# Altium PCB Baseboard-v2.0.PcbDoc (part 6 of 7)
Units mil, origin at the board's own origin, x right, y up, seen from the top; angles counter-clockwise.
Board outline 4488.19 x 3937 mil, 4 copper layers (Top Layer, Ground, Power + Signal, Bottom Layer), stack 61.81 mil thick; 219 components, 194 nets, 891 pads, 446 vias.
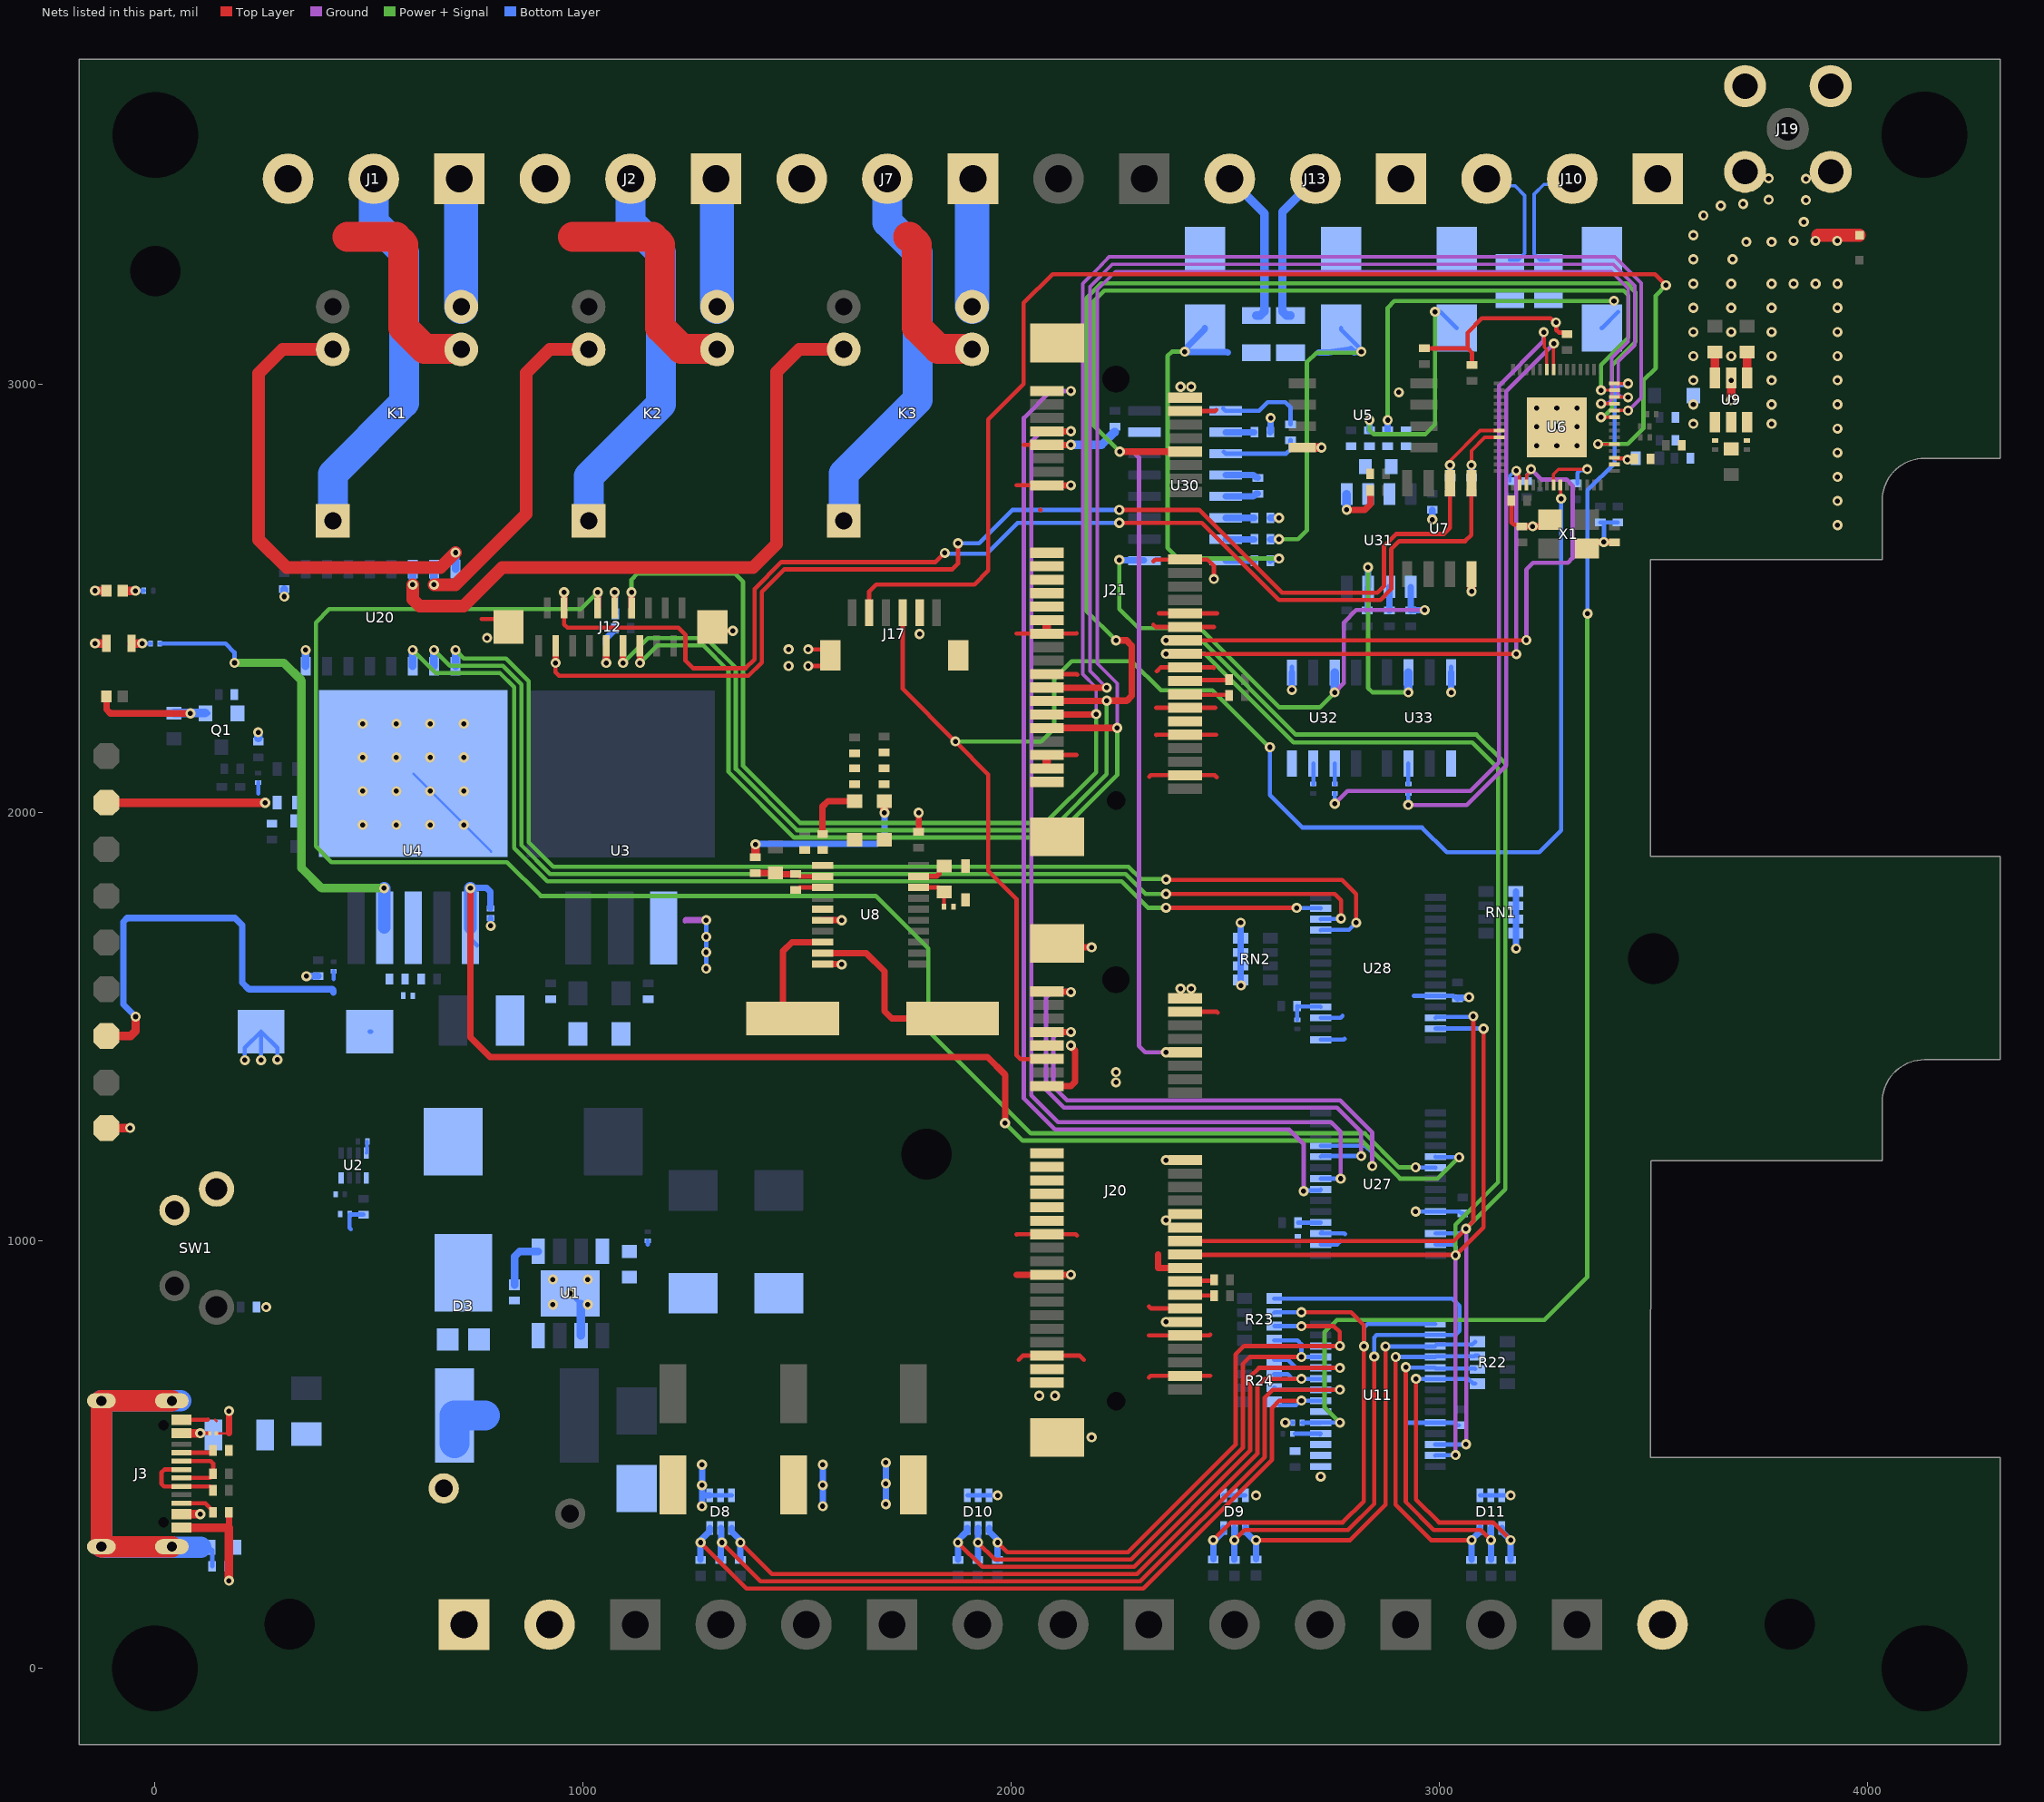
[diagram p5: the nets of this part, all layers, seen from the top]

## Via types
v1: diameter 23.62, hole 11.81, Top Layer to Bottom Layer, 446 vias

## Nets (pads, with @x,y where several pads share a name; then routed paths per layer and width w, separated by ;. In a path a pad name is that pad's centre, name@x,y a point inside that pad or via, vN(x,y) a via of type N, cw(c..) or ccw(c..) an arc to the next point about the centre after c; other vN are vias at no path point) (continued)
GND: ANT1.GND C1.1 C2.1 C4.2 C5.2 C6.2 C7.2 C8.2 C9.1 C10.1 C11.2 C12.2 C13.1 C14.2 C15.2 C16.1 C17.1 C18.1 C19.1 C20.1 C21.1 C22.1 C23.1 C24.1 C25.1 C26.1 C27.1 C28.1 C29.1 C30.1 C32.1 C35.2 C36.2 C37.2 C38.2 C39.1 C40.2 C41.2 C44.2 C45.2 C54.1 D1.2 D2.1 D3.1 D3.3 D4.2 D8.1 D8.2 D8.3 D9.1 D9.2 D9.3 D10.1 D10.2 D10.3 D11.1 D11.2 D11.3 D40.1 D41.1 D42.1 D43.1 J3.A1/B12 J3.B1/A12 J5.1 J10.1 J11.2 J12.MP1 J12.MP2 J13.1 J17.2 J17.MP1 J17.MP2 J19.2 J19.3 J19.4 J19.5 J20.4 J20.9 J20.15 J20.17 J20.18 J20.19 J20.21 J20.23 J20.25 J20.26 J20.27 J20.28 J20.29 J20.34 J20.35 J20.40 J20.42 J20.44 J20.47 J20.49 J20.50 J20.51 J20.53 J20.54 J21.4 J21.9 J21.15 J21.17 J21.18 J21.19 J21.21 J21.23 J21.25 J21.26 J21.27 J21.28 J21.29 J21.34 J21.35 J21.40 J21.42 J21.44 J21.47 J21.49 J21.50 J21.51 J21.53 J21.54 LED1.2 LED2.2 P7.1 R1.2 R2.2 R3.2 R4.2 R8.1 R9.1 R12.1 R13.1 R14.1 R21.1 R48.2 R72.2 RN1.5 RN1.6 RN1.7 RN1.8 RN2.5 RN2.6 RN2.7 RN2.8 SW1.1 SW1.4 U1.6 U1.9 U2.1 U3.1 U4.3 U4.6 U5.4 U6.57 U7.4 U8.5 U8.6 U8.10 U9.2 U11.10 U11.15 U11.16 U11.17 U20.8 U27.10 U27.16 U27.17 U28.10 U28.15 U28.17 U30.15 U31.5 U32.4 U32.5 U33.4 U33.5 X1.2 X1.4 | length 7682.1
  Top Layer w5: 140.23,581.46 143.79,577.89 ; D1.2@143.79,549.34 172.92,549.34
  Top Layer w10: J3.A1/B12@61.92,580.83 123.32,580.83 123.94,581.46 ; 763.21,2451.32 807.8,2451.32 J12.MP1@826.02,2433.09 J12.MP1@823.93,2431 ; J12.MP2@1302.4,2433.09 1311.81,2423.69 v1(1350.19,2423.69) ; v1(1526.4,2341.57) 1559.17,2341.57 1577.79,2360.2 J17.MP2@1577.79,2366.74 1563.96,2380.57 v1(1526.4,2380.57) ; U8.10@1559.8,1645.4 U8.10@1560.16,1645.04 ; 2013,1014 2013.21,1014.21 J20.29@2083.72,1014.21 2150.79,1014.21 2154,1011 ; 2013.12,2417.21 J21.29@2083.72,2417.21 2152.56,2417.21 2153.28,2417.93 ; 2013.12,2763.67 J21.15@2083.72,2763.67 ; 2018,721 2027.75,730.75 J20.47@2083.72,730.75 2160.59,730.75 2170.34,721 ; 2029.35,2858.16 J21.9@2083.72,2858.16 ; 2068.25,2706 2069.06,2706 ; J21.47@2083.72,2133.75 2153.28,2133.75 ; J21.35@2083.72,2322.72 2153.28,2322.72 2155,2321 ; J21.53@2084.77,3118.92 J21.53@2107.35,3096.35 ; J20.53@2107.35,1693.35 J20.53@2116.39,1684.3 ; 2322.01,777.99 J20.44@2406.56,777.99 2463.79,777.99 2465.64,779.85 ; 2322.19,679.57 2326.13,683.5 J20.50@2406.56,683.5 2465.64,683.5 ; 2322.19,845.67 2326.87,840.98 J20.40@2406.56,840.98 ; 2323,2083 2326.5,2086.5 J21.50@2406.56,2086.5 2475.96,2086.5 2480.64,2081.82 ; 2332.54,2438 2337.58,2432.96 J21.28@2406.56,2432.96 2474,2432.96 ; 2332.54,2585.8 2337.18,2590.44 J21.18@2406.56,2590.44 2459.08,2590.44 2474,2575.52 v1(2474,2545) ; 2338.65,2180.54 2339.11,2180.99 J21.44@2406.56,2180.99 2479.09,2180.99 ; 2338.65,2243.98 J21.40@2406.56,2243.98 2477.11,2243.98 ; 2340.54,2329.17 2349.84,2338.47 J21.34@2406.56,2338.47 2473.03,2338.47 2474,2337.5 ; 2345.47,2464.46 J21.26@2406.56,2464.46 2481.5,2464.46 ; J20.4@2406.56,1533.9 2481.1,1533.9 2483,1532 ; 2476.9,2936.9 2480,2940 ; C27.1@2965.57,3083.48 3066.61,3083.48 ; v1@3075.61,2516 v1(3076,2516) ; C26.1@3076.93,3044.63 3076.93,3073.17 3066.61,3083.48 ; C17.1@3168.92,2727.83 3168.92,2677.51 3174.78,2671.65 3189.63,2671.65 C30.1@3193.56,2667.72 ; C54.1@3298.85,3117.15 3295.25,3120.75 3279.73,3120.75 3273.87,3126.61 3273.87,3144.16 v1(3273.13,3144.16) 3270.11,3144.16 3260.46,3153.81 3100.14,3153.81 3066.61,3120.28 3066.61,3083.48
  Top Layer w11: J21.4@2406.56,2936.9 2476.9,2936.9
  Top Layer w14: C32.1@1784.21,1954.13 v1(1784.21,1998.81)
  Top Layer w15: v1(-140,2394.44) v1@-139.91,2394.53 ; LED2.2@-113.79,2394.53 LED2.2@-113.71,2394.61 ; 172.92,329 R2.2@172.92,364.5 ; 172.92,549.34 v1(172.92,601.46) ; U8.6@1559.8,1747.76 v1(1604.4,1747.76) ; U8.10@1560.16,1645.04 v1@1604.4,1645.04 ; 2013.21,919.72 J20.35@2083.72,919.72 v1(2140,919.72) ; J20.15@2083.72,1360.67 2140,1360.67 2149.26,1369.93 2149.26,1443.56 2140,1452.82 v1(2140,1455.16) ; J21.15@2083.72,2763.67 v1(2140,2763.67) ; J21.9@2083.72,2858.16 v1(2140,2858.16) ; J20.53@2116.39,1684.3 v1(2188.34,1684.3) ; 2343.53,935.47 2344.01,935.47 ; 2343.81,967.27 2344.01,967.07 2344.01,935.47 ; J20.34@2396.56,935.47 2344.01,935.47 ; v1(2784.14,2706.59) 2826.98,2706.59 2839.32,2718.94 C24.1@2839.32,2751.56 ; C30.1@3193.56,2667.72 v1(3218.56,2667.72) 3243.45,2667.72 X1.2@3258.95,2683.22 ; X1.4@3345.56,2616.29 3359.99,2630.72 C29.1@3409.79,2630.72 3409.54,2630.97 3385.04,2630.97 v1(3384.79,2631.22)
  Top Layer w20: v1(-140,2517.61) LED1.2@-112.92,2517.61 ; v1@-139.91,2394.53 LED2.2@-113.79,2394.53 ; P7.1@-113.27,1262.51 v1(-58,1262.51) ; J3.B1/A12@61.92,328.87 173.05,328.87 ; 172.92,329 173.05,328.87 ; v1(173.05,205) 173.05,328.87 ; J21.49@2083.72,2102.25 J21.47@2083.72,2133.75 ; J21.29@2083.72,2417.21 J21.27@2083.72,2448.71 ; U5.4@2680.78,2851.84 v1(2725.3,2851.84) ; v1@3075.61,2516 U7.4@3075.61,2556.15 ; v1@3682.11,2962.62 U9.2@3682.11,3014.59
  Top Layer w30: 3885.03,3347.88 3885.03,3347.76 ANT1.GND@3982.17,3347.76
  Ground w10: 1237.94,1745.17 1240.77,1748
  Ground w15: 1240.77,1748 v1(1288,1748)
  Bottom Layer w5: U4.6@603.44,2090.17 U4.6@785.61,1908
  Bottom Layer w10: v1(210,1421) 210,1449.63 C14.2@247.88,1487.5 ; v1(247.88,1421) C14.2@247.88,1487.5 ; v1(286,1422) 286,1449.38 C14.2@247.88,1487.5 ; C36.2@302.21,2521.59 C36.2@302.39,2521.41 ; v1(354,1617) v1@354.04,1617.04 ; R14.1@381.4,1617.07 R14.1@381.4,1617.07 ; R8.1@454.77,1061.09 R8.1@454.77,1060.66 ; 458,1026 454.77,1029.23 R8.1@454.77,1060.66 ; C2.1@487.65,1059.59 486.9,1060.34 455.09,1060.34 R8.1@454.77,1060.66 ; R13.1@783.86,1753.36 R13.1@784.1,1753.12 ; v1@784.1,1734.83 v1(784.33,1734.6) ; v1(970.47,876.09) U1.9@995.47,851.09 ; 1278.14,403.58 1278.85,404.28 ; v1(1288,1634.75) v1(1288,1673) v1(1288,1709) v1(1288,1748) ; D8.1@1296.13,404.28 D8.2@1321.72,404.28 D8.3@1347.31,404.28 ; D10.1@1897.88,404.28 D10.2@1923.47,404.28 D10.3@1949.06,404.28 v1(1968.55,404.28) ; D9.1@2496.37,404.28 D9.2@2521.96,404.28 D9.3@2547.55,404.28 ; v1(2640.9,574.19) R48.2@2658.39,574.19 ; U32.5@2656.27,2326.26 U32.5@2656.27,2340 ; U27.16@2723.68,990.62 2762.15,990.62 2770,998.46 ; U28.15@2723.67,1468.69 2777.28,1468.69 2779.17,1470.57 ; U28.17@2723.67,1519.87 2769.85,1519.87 2774.53,1524.54 ; U27.17@2726.94,1019.48 U27.17@2723.68,1016.21 2778.86,1016.21 2780.35,1014.72 ; 2922.18,571.87 2924.5,574.19 U11.10@2991.08,574.19 3036.79,574.19 3042.9,568.07 C35.2@3046.4,568.07 ; 2941.4,1571.05 U28.10@2991.39,1571.05 3033.49,1571.05 3039.47,1565.07 C38.2@3042.97,1565.07 ; v1(2945.4,1067.39) U27.10@2991.39,1067.39 ; U27.10@2991.54,1067.53 3047.15,1067.53 3051.7,1062.98 C37.2@3055.2,1062.98 ; U33.4@3028.27,2326.59 U33.4@3028.27,2340 ; D11.1@3095.55,404.28 D11.2@3121.14,404.28 D11.3@3146.73,404.28 v1(3167.14,404.28) ; C19.1@3376.96,2676.85 3377.22,2677.12 C19.1@3385.23,2677.12 ; v1@3385.23,2628.69 C19.1@3385.23,2677.12 ; C18.1@3417.28,2677.12 C19.1@3385.23,2677.12
  Bottom Layer w14: v1@784.1,1734.83 R13.1@784.1,1753.12
  Bottom Layer w15: C36.2@302.21,2521.24 C36.2@302.39,2521.41 ; v1(1278.14,378.98) 1278.14,403.58 v1(1278.14,427.98) v1(1278.14,475.98) ; 1278.85,404.28 D8.1@1296.13,404.28 ; v1(1560.14,378.98) v1(1560.14,427.98) v1(1560.14,475.98) ; v1(1707.5,383.89) v1(1707.5,431.89) v1(1707.5,480.89) ; RN2.5@2536.4,1608.01 RN2.6@2536.4,1641.08 RN2.7@2536.4,1672.57 RN2.8@2536.4,1705.65 v1(2536.4,1741.91) ; C45.2@2605.4,2887.72 2605.95,2888.26 2605.95,2920.67 v1(2606.49,2921.21) ; C44.2@2605.5,2687.82 C44.2@2605.4,2687.72 v1(2626,2687.72) ; v1(2656.27,2285.81) U32.5@2656.27,2326.26 ; v1(2984.21,2683.81) C40.2@2984.21,2706.59 ; v1(3028.27,2280) U33.4@3028.27,2326.59 ; C38.2@3042.97,1565.07 3044.43,1566.54 3068.54,1566.54 v1(3070,1568) ; RN1.5@3179.4,1814.65 3179.81,1814.24 v1(3179.81,1681.68)
  Bottom Layer w16: v1@354.04,1617.04 R14.1@381.4,1617.07
  Bottom Layer w18: v1(302.21,2503.81) C36.2@302.21,2521.24 ; U20.8@352.14,2341.39 v1(352.14,2378.96)
  Bottom Layer w20: 241.4,2173.7 v1(241.4,2186.57) ; U1.6@995.47,777.77 U1.9@995.47,851.09 ; v1(2140,2858.16) 2211.69,2858.16 2241.75,2888.22 2242.92,2888.22 ; v1(2784.14,2706.59) U31.5@2784.14,2743.02
  other v1: 2572.47,404.28 2723.36,448 2188.34,539.8 2066,637 2102.94,637 2362,809.49 260,843.98 929.68,850.09 1011.26,850.09 929.68,908.59 1011.26,908.59 2362,1047 2362,1187.44 2537.28,1595.21 1604.4,1644.68 485.45,1970.55 564.19,1970.55 642.93,1970.55 721.67,1970.55 485.45,2049.29 564.19,2049.29 642.93,2049.29 721.67,2049.29 485.45,2128.03 564.19,2128.03 642.93,2128.03 721.67,2128.03 485.45,2206.77 564.19,2206.77 642.93,2206.77 721.67,2206.77 1480.4,2341.57 1480.4,2380.57 776,2407 1786.46,2416.45 3930.84,2670.71 3930.84,2727.09 3930.84,2783.47 3930.84,2839.85 3227.68,2856 3275.13,2856 3322,2856 3930.84,2896.24 3227.68,2900.7 3275.13,2900.7 3322,2900.7 3594,2907.24 3777,2907.24 3227.68,2944.35 3275.13,2944.35 3322,2944.35 3594,2952.62 3777,2952.62 3930.84,2952.62 3682.41,2962.62 2906,2981 3594,3009 3682.41,3009 3777,3009 3930.84,3009 3594,3065.38 3682.41,3065.38 3777,3065.38 3930.84,3065.38 3594,3121.76 3682.41,3121.76 3777,3121.76 3930.84,3121.76 3594,3178.15 3682.41,3178.15 3777,3178.15 3930.84,3178.15 3594,3234.53 3682.41,3234.53 3777,3234.53 3828.28,3234.53 3879.56,3234.53 3930.84,3234.53 3594,3291.56 3685.61,3291.56 3717.84,3332.3 3777,3332.3 3828.28,3334.77 3879.39,3334.77 3930.3,3334.77 3594,3347.94 3852.17,3379.04 3617.68,3394.02 3658.2,3416.84 3710.35,3420.84 3857.17,3429.76 3770,3430.76 3857.17,3479.54 3770,3480.54
GSM/W5500/LORA_RSTA: J21.7 U27.22 | length 2600.4
  Top Layer w10: J21.7@2083.72,2889.65 J21.7@2083.9,2889.83 ; v1@2139.83,2889.83 v1(2140,2890)
  Top Layer w15: J21.7@2083.9,2889.83 v1@2139.83,2889.83
  Ground w10: v1(2140,2890) 2071.36,2890 2047.12,2865.76 2047.12,1338.51 2109.63,1276 2747.57,1276 2770,1253.57 v1(2770,1144.16)
  Bottom Layer w10: U27.22@2723.68,1144.16 v1(2770,1144.16)
GSM/W5500/LORA_RSTB: J20.7 U27.25 | length 1243.9
  Top Layer w15: J20.7@2083.72,1486.65 v1(2140,1486.65)
  Ground w10: v1(2140,1486.65) 2139.65,1487 2111.31,1487 2099,1474.69 2099,1358.75 2130.75,1327 2768.7,1327 2843.85,1251.85 v1(2843.85,1173.61)
  Bottom Layer w10: U27.25@2723.68,1220.93 2827.78,1220.93 2843.85,1204.86 v1(2843.85,1173.61)
GSM/W5500_PWR_ENA: J21.1 U27.21 | length 2575.1
  Top Layer w5: J21.1@2083.72,2984.14 J21.1@2083.87,2984
  Ground w10: v1(2140,2984) 2092.97,2984 2030.12,2921.15 2030.12,1331.47 2102.58,1259 2649.71,1259 2683.53,1225.18 v1(2683.53,1114.98)
  Bottom Layer w10: v1(2683.53,1114.98) 2685.32,1116.78 2721.88,1116.78 U27.21@2723.68,1118.57
GSM/W5500_PWR_ENB: J20.1 U27.24 | length 1264.5
  Top Layer w10: J20.1@2083.72,1581.14 J20.1@2084.29,1580.57
  Top Layer w15: J20.1@2084.29,1580.57 v1@2140,1580.57
  Ground w10: v1(2140,1580) 2139,1581 2095.97,1581 2082,1567.03 2082,1351.71 2123.71,1310 2761.66,1310 2818.04,1253.62 v1@2818.04,1197
  Bottom Layer w10: U27.24@2723.68,1195.34 2725.33,1197 v1@2818.04,1197
  other v1: 2818.07,1196.97
GSM_BUCK_EN: R13.2 U4.1 U27.5 | length 3167.8
  Top Layer w15: v1(737,1822.57) 737,1474.18 783.18,1428 1945.24,1428 1986,1387.24 v1(1986,1274)
  Power + Signal w10: v1(1986,1274) 2027,1233 2819.79,1233 2908.63,1144.16 2997.16,1144.16 v1(3047,1194)
  Bottom Layer w10: U4.1@737.3,1730.13 737.3,1704.08 U4.1@752.38,1689 ; R13.2@783.86,1775.01 783.86,1775.18 R13.2@784.01,1775.33 ; U27.5@2991.39,1195.34 2992.06,1194.67 3046.33,1194.67 v1(3047,1194)
  Bottom Layer w15: v1@737.44,1823.01 775.4,1823.01 784.01,1814.4 R13.2@784.01,1775.33
  Bottom Layer w30: v1(737,1822.57) 737,1730.43 U4.1@737.3,1730.13
GSM_PWR: C10.2 C14.1 J20.2 J21.2 P6.1 R11.2 R12.2 R20.2 U4.4 | length 2134.9
  Top Layer w20: P6.1@-113.27,1477.51 -56.72,1477.51 -45,1489.23 v1(-45,1522.51)
  Power + Signal w20: v1(185.9,2349.07) 300.93,2349.07 342.55,2307.45 342.55,1869.7 389.68,1822.57 v1(535.4,1822.57)
  Bottom Layer w10: R20.2@11.45,2394.14 165.02,2394.14 185.9,2373.26 v1(185.9,2349.07) ; 417.4,1610.5 R11.2@417.4,1628.75 ; C14.1@501.42,1487.5 C14.1@505.75,1487.5 ; U4.4@535.4,1731.24 U4.4@536.51,1730.13
  Bottom Layer w15: v1(-45,1522.51) -73.51,1551.02 -73.51,1744.21 -64.73,1753 187,1753 204,1736 204,1602 219.49,1586.51 414.4,1586.51 417.4,1583.51 417.4,1578.5
  Bottom Layer w30: U4.4@535.4,1731.24 v1(535.4,1822.57)
  other v1: 2245.14,1368.95 2245.14,1393.08 2396,1588 2421,1588 2396,2994 2421,2994
IN_1: J1.2 K1.1 | length 896.9
  Bottom Layer w70: K1.1@415.47,2681.09 415.47,2789.78 582.04,2956.34 582.04,3307.25 511.09,3378.2 J1.2@511.09,3479.58
IN_2: J2.2 K2.1 | length 897.8
  Bottom Layer w70: K2.1@1013.21,2681.09 1013.21,2784.16 1182.04,2952.98 1182.04,3307.25 1111.09,3378.2 J2.2@1111.09,3479.58
IN_3: J7.2 K3.1 | length 899.5
  Bottom Layer w70: K3.1@1609.21,2681.09 1609.21,2791.21 1782.04,2964.04 1782.04,3307.25 1711.09,3378.2 J7.2@1711.09,3479.58
IO0: J17.5 U6.5 | length 3063.1
  Top Layer w5: U6.5@3409.97,2860.01 U6.5@3410.07,2859.91
  Top Layer w7: v1(3371.19,2860.14) 3371.3,2860.03 U6.5@3409.95,2860.03
  Top Layer w10: J17.5@1668.35,2466.15 1668.35,2515.34 1685.13,2532.12 1914.55,2532.12 1946.9,2564.48 1946.9,2917.65 2029.58,3000.33 2029.58,3000.85 ; 2029.59,3000.87 2029.59,3189.59 2096.97,3256.97 3504.13,3256.97 v1(3530.1,3231)
  Power + Signal w10: v1(3371.19,2860.14) 3440.82,2860.11 3477.45,2896.74 3477.45,3008.77 3506.29,3037.62 3506.29,3207.19 v1(3530.1,3231)
IO1: D8.6 R24.4 R35.2 U11.21 | length 1884.9
  Top Layer w10: v1(1274.72,294.2) 1382.35,186.57 2308.78,186.57 2609.64,487.43 2609.64,608.73 2626.28,625.37 2678.05,625.37 v1(2678.4,625.72)
  Bottom Layer w10: R24.4@2626.9,615.02 2665.73,615.02 2676.42,625.72 v1(2678.4,625.72) ; v1@2678.4,625.37 U11.21@2723.36,625.37
  Bottom Layer w15: R35.2@1274.72,253.56 v1@1274.72,298.62 ; v1@1274.72,299.62 1292.26,317.16 1293.26,317.16 1296.13,320.03 D8.6@1296.13,327.91
IO2: D8.5 R24.3 R37.2 U11.22 | length 1981.6
  Top Layer w10: v1(1324.5,294.2) 1415.13,203.57 2301.74,203.57 2592.64,494.47 2592.64,632.72 2611.01,651.09 v1(2768.4,651.09)
  Bottom Layer w10: R24.3@2615.02,656.06 2620.12,650.96 U11.22@2723.36,650.96 ; U11.22@2723.36,651.03 2768.33,651.03 v1(2768.4,651.09)
  Bottom Layer w15: R37.2@1321.72,253.56 v1@1321.72,299.62 ; D8.5@1321.72,327.91 1323.11,326.51 1323.11,298.23 v1@1324.5,296.84
IO3: D8.4 R24.2 R39.2 U11.23 | length 1812.8
  Top Layer w10: v1(1367.72,294.2) 1441.35,220.57 2226.49,220.57 2294.7,220.57 2575.64,501.52 2575.64,659.8 2592.39,676.55 v1(2678.4,676.55)
  Bottom Layer w10: R24.2@2615.02,687.56 2646.03,687.56 2657.04,676.55 v1(2678.4,676.55) ; v1@2684.08,676.55 U11.23@2723.36,676.55
  Bottom Layer w15: D8.4@1347.31,327.91 1347.31,320.03 1367.72,299.62 R39.2@1367.72,253.56
IO4: D10.6 R24.1 R41.2 U11.24 | length 1453.5
  Top Layer w10: v1(1876.14,294.2) 1932.77,237.57 2287.66,237.57 2558.64,508.56 2558.64,681.83 2578.96,702.14 v1(2768.4,702.14)
  Bottom Layer w10: R24.1@2615.02,720.63 2647.35,720.63 2665.84,702.14 U11.24@2723.36,702.14 v1(2768.4,702.14)
  Bottom Layer w15: R41.2@1876.14,253.56 v1(1876.14,294.2) v1@1876.14,298.29 ; v1@1876.14,299.62 1893.68,317.16 1895.01,317.16 1897.88,320.03 D10.6@1897.88,327.91
IO5: D10.5 R23.4 R43.2 U11.25 | length 1299.3
  Top Layer w10: v1(1922.81,294.2) 1962.43,254.57 2212.41,254.57 2280.62,254.57 2541.64,515.6 2541.64,711.35 2558.02,727.73 v1(2678.4,727.73)
  Bottom Layer w10: R23.4@2615.02,766.38 2669.36,766.38 2678.4,757.34 v1(2678.4,727.73) U11.25@2723.36,727.73
  Bottom Layer w15: R43.2@1922.14,253.56 1922.81,254.22 1922.81,299.62 1922.81,327.24 D10.5@1923.47,327.91
IO6: D10.4 R23.3 R45.2 U11.26 | length 1451.2
  Top Layer w10: v1(1968.55,294.2) 1991.17,271.57 2273.57,271.57 2524.64,522.64 2524.64,733.76 2544.21,753.32 v1(2768.4,753.32) 2768,753.72 2768,786 2754.4,799.6 v1(2678.4,799.6)
  Bottom Layer w10: R23.3@2615.16,799.6 v1(2678.4,799.6) ; U11.26@2723.36,753.32 v1(2768.4,753.32)
  Bottom Layer w15: D10.4@1949.06,327.91 1949.06,320.03 1968.55,300.54 R45.2@1968.55,253.56
IO7: D9.6 R23.2 R36.2 U11.1 | length 1318.8
  Top Layer w10: v1(2472.47,299.62) 2513.85,341 2774.83,341 2824.4,390.57 v1(2824.4,752.57) 2824.4,801.85 2794.16,832.09 v1(2678.4,832.09)
  Bottom Layer w10: R23.2@2615.02,830.95 2616.16,832.09 v1(2678.4,832.09) ; v1(2824.4,752.57) 2824.4,796.24 2832.67,804.5 U11.1@2991.08,804.5
  Bottom Layer w15: R36.2@2472.47,254.59 v1@2472.47,296.13 ; v1(2472.47,299.62) 2475.96,299.62 2496.37,320.03 D9.6@2496.37,327.91
IO8: D9.5 R23.1 R38.2 U11.2 | length 1529.2
  Top Layer w10: v1(2521.96,299.62) 2545.77,323.43 2787.52,323.43 2848.4,384.32 v1(2848.4,728.57)
  Bottom Layer w10: R23.1@2615.02,864.02 3030.98,864.02 3048,847 3048,788.42 3038.5,778.91 U11.2@2991.08,778.91 2854.26,778.91 2848.4,773.06 v1(2848.4,728.57)
  Bottom Layer w15: R38.2@2521.96,253.56 v1(2521.96,299.62) D9.5@2521.96,327.91
IO9: D9.4 R22.4 R40.2 U11.3 | length 1002.4
  Top Layer w10: v1(2572.47,299.62) 2792.06,299.62 2874.74,382.3 v1(2874.74,752.24)
  Bottom Layer w10: v1(2874.74,752.24) 2989.99,752.24 2994.34,756.59 3077.85,756.59 R22.4@3084.4,763.14
  Bottom Layer w15: D9.4@2547.55,327.91 2547.55,320.03 2565.35,302.23 2569.87,302.23 v1(2572.47,299.62) ; R40.2@2572.47,254.59 v1@2572.47,295.11
IO10: D11.6 R22.3 R42.2 U11.4 | length 833.8
  Top Layer w10: v1(2898.55,727.73) 2898.55,382.43 2981.35,299.62 v1(3076.14,299.62)
  Bottom Layer w10: v1(2898.55,727.73) U11.4@2991.08,727.73 2992.75,729.4 3082.73,729.4 3084.4,731.07 R22.3@3091.4,731.07
  Bottom Layer w15: R42.2@3076.14,253.56 v1(3076.14,299.62) 3076.14,300.62 3095.55,320.03 D11.6@3095.55,327.91
IO11: D11.5 R22.2 R44.2 U11.5 | length 782.3
  Top Layer w10: v1(2922.4,703.92) 2922.18,703.7 2922.18,388.8 2987.54,323.43 3097.33,323.43 v1(3121.14,299.62)
  Bottom Layer w10: v1@2929.4,703.92 2930.29,703.03 2990.19,703.03 2992.36,700.86 3083.12,700.86 R22.2@3084.4,699.57
  Bottom Layer w15: R44.2@3121.14,253.56 v1(3121.14,299.62) D11.5@3121.14,327.91
IO12: D11.4 R22.1 R46.2 U11.6 | length 771.2
  Top Layer w10: v1(2945.99,676.55) 2945.99,394.73 2999.72,341 3125.76,341 v1(3167.14,299.62)
  Bottom Layer w10: v1@2942.99,676.55 v1(2945.99,676.55) U11.6@2991.08,676.55 3068.43,676.55 3079.48,665.5 R22.1@3084.4,665.5
  Bottom Layer w15: D11.4@3146.73,327.91 3146.73,320.03 v1(3167.14,299.62) R46.2@3167.14,253.56
LED_DATA: J12.8 U27.6 | length 4287.8
  Top Layer w10: v1(1034.68,2513.75) v1@1034.68,2515.36
  Top Layer w15: J12.8@1034.68,2477.39 v1(1034.68,2513.75)
  Power + Signal w10: v1(1034.68,2513.75) 995.31,2474.37 407.33,2474.37 376,2443.04 376,1920.18 412.6,1883.57 822.43,1883.57 901.44,1804.56 1683.94,1804.56 1807,1681.5 1807,1489.04 2046.04,1250 2826.83,1250 2906.23,1170.61 v1(2945.4,1170.61)
  Bottom Layer w10: v1(2945.4,1170.61) 2945.83,1170.18 2990.97,1170.18 U27.6@2991.39,1169.75
LINEOUT: C48.1 D12.2 D13.1 P9.1 R91.1 R93.1 | length 395.2
  Top Layer w20: P9.1@-113.27,2022.51 -113.19,2022.43 v1@255.92,2022.43
  Bottom Layer w10: 241.4,2043.72 R93.1@241.4,2069.75
  other v1: 257.59,2022.19
LORA_IO0: J20.10 J21.10 U6.13 | length 3611.4
  Top Layer w5: v1@3378.95,2985.68 v1@3379.17,2985.9
  Top Layer w7: v1@3379.17,2985.9 U6.13@3410.07,2985.9
  Top Layer w10: J20.10@2406.46,1439.31 J20.10@2406.56,1439.41
  Top Layer w15: v1(2253.96,2842.41) J21.10@2406.56,2842.41 ; v1(2362,1439.2) 2362.1,1439.31 J20.10@2406.46,1439.31
  Ground w10: v1(2253.96,2842.41) 2285.04,2842.41 2299,2828.45 2299,1454 2313.8,1439.2 v1(2362,1439.2)
  Power + Signal w10: v1(2253.96,2842.41) 2193,2903.37 2193,3193.54 2217.83,3218.37 3431.4,3218.37 3442.08,3207.68 3442.08,3108.51 3378.46,3044.89 v1(3378.46,2985.68)
MUX1_INT: R48.1 U6.14 U11.19 U11.20 | length 3153.9
  Top Layer w7: U6.14@3410.17,3001.55 3441.31,3001.55 v1(3441.4,3001.46)
  Ground w10: v1@3346,2464.83 v1(3346.83,2464)
  Power + Signal w10: v1@2768.37,574.19 2732.35,610.21 2732.35,785.44 2761.15,814.25 3246.25,814.25 3346,914 3346,2463.17 v1(3346.83,2464)
  Bottom Layer w10: R48.1@2680.04,574.19 U11.19@2723.36,574.19 U11.19@2723.36,574.19 2768.34,574.25 v1(2768.4,574.3) ; v1(3346.83,2464) 3346.83,2751.97 3410.14,2815.28 3410.14,2992.45 3416.54,2998.85 3438.79,2998.85 v1(3441.4,3001.46)
MUX_I2C.MUX_SCL: J20.30 J21.30 R16.1 U6.45 U11.12 U27.12 U28.12 | length 5425.4
  Top Layer w7: U6.45@3204.36,2764.44 3204.42,2764.5 3204.42,2787.74 3214.92,2798.24 v1(3214.92,2801.25)
  Top Layer w10: J20.30@2406.56,998.46 3034.46,998.46 v1(3063,1027) 3079.91,1043.91 v1(3079.91,1523.54) ; J21.30@2406.56,2401.46 v1@3204,2401.46
  Top Layer w15: v1(2362,2401.46) J21.30@2406.56,2401.46
  Ground w10: v1(3062.81,523.57) 3063.41,524.17 3063.41,1026.59 v1(3063,1027) ; v1(3204,2402) 3204,2566.92 3219.89,2582.81 3300.9,2582.81 3312,2593.91 3312,2762.86 3297.62,2777.24 3238.94,2777.24 v1(3214.92,2801.25)
  Power + Signal w10: v1(2362,2401.46) 2445.39,2401.46 2665.27,2181.58 3087.36,2181.58 3155,2113.94 3155,1119 v1(3063,1027)
  Bottom Layer w8: R16.1@3204.42,2773.33 3204.42,2787.06 3214.92,2797.57 v1(3214.92,2801.25)
  Bottom Layer w10: U11.12@2991.08,523.01 2991.36,523.29 3062.53,523.29 v1(3062.81,523.57) ; U27.12@2991.39,1016.21 3050.33,1016.21 3061.12,1027 v1(3063,1027) ; U28.12@2991.39,1519.87 2993.22,1521.7 3071.08,1521.7 v1@3072.91,1523.54
MUX_I2C.MUX_SDA: J20.32 J21.32 R15.1 U6.44 U11.13 U27.13 U28.13 | length 5267.7
  Top Layer w5: J21.32@2406.56,2369.97 J21.32@2407.06,2369.47
  Top Layer w7: v1(3180.67,2797.41) 3180.67,2792.91 3187.78,2785.8 3187.78,2765.27 U6.44@3188.61,2764.44
  Top Layer w10: J20.32@2406.56,966.97 2407.54,965.98 3037.61,965.98 v1(3038.59,965) 3104,1030.41 3104,1494.14 v1(3103.83,1494.31) ; J21.32@2407.06,2369.47 v1(3180.67,2369.47)
  Top Layer w15: v1(2362,2369.97) J21.32@2406.56,2369.97
  Ground w10: v1(3038.4,498.57) 3038.5,498.67 3038.5,964.91 v1(3038.59,965) ; v1(3180.67,2369.47) 3180.19,2369.95 3180.19,2791.11 3180.67,2791.6 v1(3180.67,2797.41)
  Power + Signal w10: v1(2362,2369.97) 2452.84,2369.97 2659.71,2163.1 3077.6,2163.1 3138,2102.7 3138,1135.67 3038.4,1036.07 3038.4,965.19 v1(3038.59,965)
  Bottom Layer w8: R15.1@3165.39,2773.33 3165.39,2785.83 ; 3165.41,2785.83 3176.98,2797.41 v1(3180.67,2797.41)
  Bottom Layer w10: U11.13@2991.08,497.42 2991.66,498 v1@3038.4,498 ; U28.13@2991.39,1494.28 2992.25,1495.14 3103,1495.14 v1(3103.83,1494.31) ; U27.13@2991.39,990.62 3032.73,990.6 3038.59,984.74 v1(3038.59,965)
NC_1: J1.1 K1.3 | length 294.1
  Bottom Layer w80: K1.3@715.47,3181.09 J1.1@715.47,3475.19
NC_2: J2.1 K2.3 | length 296.4
  Bottom Layer w80: K2.3@1313.21,3181.09 J2.1@1313.21,3477.45
NC_3: J7.1 K3.3 | length 296.6
  Bottom Layer w80: K3.3@1909.21,3181.09 J7.1@1909.21,3477.7
NetC3_1: C3.1 U1.1 | length 126.5
  Bottom Layer w18: C3.1@840,896.09 840,961.92 852.5,974.42 U1.1@895.47,974.42
NetC3_2: C3.2 D3.2 L1.1 U1.8
NetC23_2: C23.2 L2.2 U6.2 U6.3 | length 47.4
  Top Layer w5: U6.3@3410.07,2828.42 U6.3@3411.9,2826.59 ; v1@3437.02,2820.54 v1(3440.21,2823.74) v1@3437.37,2826.59 ; C23.2@3448.21,2822.74 3451.07,2822.74 C23.2@3456.67,2828.34
  Top Layer w10: U6.3@3411.9,2826.59 v1@3437.37,2826.59
NetC31_2: C31.2 U9.1 | length 60.7
  Top Layer w10: C31.2@3719.51,3074.42 C31.2@3720.11,3075.02
  Top Layer w20: U9.1@3719.51,3014.59 C31.2@3719.51,3074.42
NetC33_1: C33.1 R25.1
NetC34_1: C34.1 R32.1
NetC42_1: C42.1 U30.4 | length 94.9
  Bottom Layer w10: U30.4@2523.99,2787.72 2527.33,2785.8 2537.75,2785.8 2539.67,2787.72
  Bottom Layer w15: U30.4@2501.28,2787.72 2523.99,2787.72 2539.67,2787.72 2566.5,2787.72 2571.5,2782.72 2575,2782.72 C42.1@2576.5,2781.22
NetC42_2: C42.2 U30.5 | length 77.9
  Bottom Layer w15: U30.5@2501.28,2737.72 2528.84,2737.72 2566.5,2737.72 2573,2744.22 C42.2@2576.5,2744.22
NetC43_1: C43.1 U30.1 | length 212.7
  Bottom Layer w10: U30.1@2495.55,2943.45 U30.1@2501.28,2937.72 2579.72,2937.72 2600,2958 2640.55,2958 2653.09,2945.46 C43.1@2653.09,2906.22
NetC43_2: C43.2 U30.3 | length 183.6
  Bottom Layer w10: U30.3@2496.96,2842.04 U30.3@2501.28,2837.72 2643.23,2837.72 2653.09,2847.57 C43.2@2653.09,2869.22
NetC44_1: C44.1 U30.6 | length 67.1
  Bottom Layer w15: U30.6@2501.28,2687.72 C44.1@2568.4,2687.72
NetC45_1: C45.1 U30.2 | length 67.1
  Bottom Layer w15: U30.2@2501.28,2887.72 C45.1@2568.4,2887.72
NetC46_1: C46.1 U9.5
NetC47_2: C47.2 U9.3 | length 60.4
  Top Layer w20: U9.3@3644.71,3014.59 C47.2@3644.71,3075.02
NetD1_1: D1.1 F1.1 J3.A4/B9 J3.B4/A9 | length 110.3
  Top Layer w5: J3.A4/B9@61.92,549.34 J3.A4/B9@62.09,549.5 ; v1(105.87,549.5) v1@105.95,549.42 ; D1.1@127.96,549.42 D1.1@128.05,549.34
  Top Layer w8: v1@105.95,549.42 D1.1@127.96,549.42
  Top Layer w20: J3.B4/A9@61.92,360.36 62.04,360.48 v1@105.96,360.48 ; J3.A4/B9@62.09,549.5 v1(105.87,549.5)
  other v1: 105.87,360.48
NetD5_1: D5.1 R29.2
NetD5_2: D5.2 R27.2 U8.19 | length 52.4
  Top Layer w12: U8.19@1784.21,1850.13 1825.85,1850.13 1831.71,1855.98 ; R27.2@1841.71,1867.09 R27.2@1844.21,1867.09
NetD6_1: D6.1 D7.1
NetD6_2: D6.2 R25.2 R26.1 | length 144.9
  Top Layer w15: R26.1@1559.8,1948.9 1559.8,2013.66 1572.32,2026.18 D6.2@1634.8,2026.18
NetD7_2: D7.2 R32.2 R33.1 | length 420.6
  Top Layer w10: D7.2@1703.8,2026.18 D7.2@1704.4,2025.58
  Top Layer w20: R33.1@1402.8,1897.22 1402.8,1924.76 v1(1403,1924.95) ; v1(1704.4,1998.81) 1704.1,1999.11 1704.1,2025.28 D7.2@1704.4,2025.58
  Bottom Layer w15: v1(1403,1924.95) 1404.05,1926 1687.83,1926 1704.4,1942.57 v1(1704.4,1998.81)
NetD40_2: D40.2 F20.1 R74.2 | length 874.6
  Power + Signal w10: v1(2880,2916) 2880,3178.43 2895.54,3193.97 v1@3407.98,3193.97
  Bottom Layer w10: D40.2@3380.16,3131.02 D40.2@3418.13,3169
  Bottom Layer w15: R74.2@2879.82,2892.06 2879.91,2892.15 2879.91,2915.91 v1(2880,2916)
  other v1: 3408.57,3194.56
NetD41_2: D41.2 F21.1 R75.2 | length 543
  Power + Signal w10: v1(2837.14,2915.91) 2837.14,2893.28 2847.37,2883.06 2967.77,2883.06 2990.59,2905.87 v1(2990.59,3169)
  Bottom Layer w10: v1(2990.59,3169) 3003.18,3169 D41.2@3041.16,3131.02
  Bottom Layer w15: R75.2@2837.14,2892.06 v1(2837.14,2915.91)
NetD42_2: D42.2 F19.2 R73.1 | length 946.6
  Power + Signal w10: v1(2405.84,3075.91) 2375.91,3075.91 2365.62,3065.62 2365.62,2618.04 2391.04,2592.62 v1(2626,2592.62)
  Bottom Layer w15: v1(2405.84,3075.91) 2407.01,3074.74 2505.03,3074.74 2506.2,3073.58 ; D42.2@2413.34,3088.84 2453.09,3128.58 D42.2@2453.09,3131.02 ; R73.1@2605.4,2587.72 2605.4,2589.47 2606.9,2590.97 2624.35,2590.97 v1(2626,2592.62)
NetD43_2: D43.2 F22.2 R76.1 | length 792.4
  Power + Signal w10: v1(2626,2637.72) 2670.72,2637.72 2691,2658 2691,3050.69 2713.88,3073.58 2816,3073.58 v1(2818.33,3075.91)
  Bottom Layer w10: D43.2@2771.09,3131.02 2771.09,3127.24 D43.2@2813.33,3085
  Bottom Layer w15: R76.1@2605.4,2637.72 v1(2626,2637.72) ; 2718.98,3073.58 2741.71,3073.58 2793.62,3081.86 2801.91,3073.58 2803.07,3074.74 2817.16,3074.74 v1(2818.33,3075.91)
NetF1_2: F1.2 FB1.1
NetF2_1: F2.1 J5.2 | length 145.5
  Bottom Layer w70: F2.1@699.8,526.13 F2.1@699.8,591.09 770.88,591.09 ; J5.2@912.46,102.58 J5.2@921.96,102.58
NetJ3_A5: J3.A5 R1.1 | length 74
  Top Layer w10: J3.A5@61.92,504.06 R1.1@135.92,504.06
NetJ3_A6: J3.A6 J3.B6 R63.1 | length 205
  Top Layer w10: J3.A6@61.92,464.69 22.16,464.69 15.19,457.72 15.19,431.18 21.05,425.32 129.42,425.32 135.92,418.82 R63.1@135.92,415.83
NetJ3_A7: J3.A7 J3.B7 R64.1 | length 180.1
  Top Layer w10: J3.A7@61.92,445.01 129.42,445.01 135.92,451.51 135.92,478.52 130.06,484.38 J3.B7@61.92,484.38
NetJ3_B5: J3.B5 R2.1 | length 84.9
  Top Layer w10: J3.B5@61.92,385.95 117.97,385.95 135.92,368 R2.1@135.92,364.5
NetJ12_9: J12.9 R65.1 | length 132.4
  Top Layer w10: v1@1054.37,2346 v1(1054.37,2348.74)
  Top Layer w15: v1(1054.37,2348.74) J12.9@1054.37,2388.8
  Bottom Layer w15: v1(1054.37,2348.74) 1054.43,2348.8 1054.43,2406.43 1074.5,2426.5 R65.1@1074.5,2430
NetJ12_10: J12.10 R66.1 | length 90.5
  Top Layer w10: v1(1074.05,2513.75) v1@1074.05,2517.45
  Top Layer w15: J12.10@1074.05,2477.39 v1(1074.05,2513.75)
  Bottom Layer w15: v1(1074.05,2513.75) 1074.65,2513.15 1074.65,2464.4 R66.1@1075.24,2463.81
NetJ20_36: J20.36 R67.1 | length 69.6
  Top Layer w10: J20.36@2406.56,903.98 2408.36,905.78 2472.84,905.78 R67.1@2474.64,907.58
NetJ20_38: J20.38 R83.1 | length 68.9
  Top Layer w10: J20.38@2406.56,872.48 2407.51,871.53 2473.69,871.53 R83.1@2474.64,870.58
NetJ21_36: J21.36 R82.1 | length 103.7
  Top Layer w10: J21.36@2406.56,2306.98 2408.36,2308.78 R82.1@2509.5,2308.78
NetJ21_38: J21.38 R84.1 | length 103.3
  Top Layer w10: J21.38@2406.56,2275.48 2407.51,2274.53 R84.1@2509.5,2274.53
NetLED1_1: LED1.1 R10.1 | length 50.1
  Top Layer w10: LED1.1@-75.52,2517.61 LED1.1@-75.37,2517.47 ; v1@-45.85,2517.47 v1(-45.71,2517.33)
  Top Layer w20: LED1.1@-75.37,2517.47 v1@-45.85,2517.47
  Bottom Layer w10: v1(-45.71,2517.33) R10.1@-25.54,2517.33
NetLED2_1: LED2.1 R20.1 | length 44.6
  Top Layer w10: LED2.1@-54.65,2394.61 LED2.1@-54.47,2394.44
  Top Layer w20: LED2.1@-54.47,2394.44 v1(-29.71,2394.44)
  Bottom Layer w10: v1(-29.71,2394.44) -29.56,2394.29 -10.35,2394.29 R20.1@-10.2,2394.14
NetLED3_2: LED3.2 Q1.1 R90.2 | length 304.8
  Top Layer w15: LED3.2@-112.92,2270.57 -112.92,2240 -103.86,2230.94 v1(82.97,2230.94)
  Bottom Layer w10: Q1.1@117.37,2231.57 Q1.1@118,2230.94 ; Q1.1@124.37,2231.57 Q1.1@125,2230.94
  Bottom Layer w20: R90.2@44.56,2231.57 Q1.1@117.37,2231.57
NetQ1_2: Q1.2 R87.1
NetR5_1: R5.1 R9.2 U1.4 | length 8.2
  Bottom Layer w10: 1151.4,990.57 R5.1@1151.4,998.75
NetR7_2: R7.2 U2.8 | length 27.7
  Bottom Layer w8: U2.8@494,1204.23 495.39,1205.62 495.39,1230.52 R7.2@495.97,1231.09
NetR17_1: R17.1 U6.49 | length 159.7
  Top Layer w7: U6.49@3267.35,2764.44 3267.35,2789.78 3278.82,2801.25 v1(3346.05,2801.25)
  Bottom Layer w10: R17.1@3323.02,2768.33 3323.02,2772.19 3323.16,2772.33 3323.16,2792.79 3329.02,2798.65 3343.44,2798.65 v1(3346.05,2801.25)
NetR26_2: R26.2 R30.2 U8.1
NetR27_1: R27.1 R29.1 U8.18 | length 91.2
  Top Layer w8: R29.1@1843.57,1779.57 R27.1@1843.57,1806.46
  Top Layer w10: U8.18@1784.21,1824.54 1831.27,1824.54 1841.71,1814.09 R27.1@1844.21,1814.09
NetR28_1: R28.1 R31.1 R33.2 U8.2 | length 160.6
  Top Layer w10: R31.1@1448.87,1858.22 R31.1@1449.21,1858.56 R31.1@1452.37,1855.4 ; R28.1@1496.8,1855.4 1500.3,1855.4 1505.58,1850.13 U8.2@1559.8,1850.13
  Top Layer w15: R33.2@1402.8,1858.22 R31.1@1448.87,1858.22 ; R31.1@1452.37,1855.4 R28.1@1496.8,1855.4
NetR28_2: R28.2 U8.3 | length 65.5
  Top Layer w10: R28.2@1496.8,1818.4 1500.3,1818.4 1506.44,1824.54 U8.3@1559.8,1824.54
NetR72_1: R72.1 R74.1 R78.1 U31.7
NetR73_2: R73.2 U30.8 | length 67.1
  Bottom Layer w15: U30.8@2501.28,2587.72 R73.2@2568.4,2587.72
NetR75_1: R75.1 R77.2 R78.2 U31.6
NetR76_2: R76.2 U30.7 | length 67.1
  Bottom Layer w15: U30.7@2501.28,2637.72 R76.2@2568.4,2637.72
NetR79_1: R79.1 U32.2 | length 47.8
  Bottom Layer w10: R79.1@2756.27,2065.83 U32.2@2756.27,2113.67
NetR80_1: R80.1 U32.3 | length 47.8
  Bottom Layer w10: R80.1@2706.27,2065.83 U32.3@2706.27,2113.67
NetR81_1: R81.1 U33.7 | length 48.2
  Bottom Layer w10: R81.1@2928.27,2065.83 U33.7@2928.27,2113.99
NetR85_2: R85.2 U9.6
NetR86_2: R86.2 U9.4
NetU8_8: U8.8 X2.1 | length 289.8
  Top Layer w15: X2.1@1467.46,1518.4 1467.46,1540.74 1467.46,1675.63 1488.41,1696.58 U8.8@1559.8,1696.58
  Top Layer w30: X2.1@1467.46,1540.74 X2.1@1489.79,1518.4
NetU8_9: U8.9 X2.2 | length 376.8
  Top Layer w15: U8.9@1559.8,1670.99 1661.79,1670.99 1704.63,1628.15 1704.63,1535.37 1721.6,1518.4 X2.2@1819,1518.4
NO_1: J1.3 K1.2 | length 488.7
  Top Layer w70: 449.62,3344.07 562.97,3344.07 580.47,3326.57 580.47,3132.17 629.88,3082.77 713.8,3082.77 K1.2@715.47,3081.09
NO_2: J2.3 K2.2 | length 559.4
  Top Layer w70: 976.4,3344.07 1162.64,3344.07 1180.14,3326.57 1180.14,3132.51 1229.88,3082.77 1311.54,3082.77 K2.2@1313.21,3081.09
NO_3: J7.3 K3.2 | length 372.6
  Top Layer w70: 1759.25,3344.07 1762.73,3344.07 1780.23,3326.57 1780.23,3132.42 1829.88,3082.77 1907.54,3082.77 K3.2@1909.21,3081.09
OLED/ENC_SCL: J12.3 R19.1 U6.36 U7.6 | length 2964.3
  Top Layer w8: U7.6@3025.61,2768.75 v1(3025.61,2810.83) 3025.61,2820.94 3096.08,2891.41 U6.36@3140.38,2891.41
  Top Layer w10: v1@936.13,2348.61 v1(936,2348.74) 936,2326.87 943.87,2319 1386.64,2319 1417.69,2350.05 1417.69,2514.65 1470.49,2567.45 1862.8,2567.45 1876.19,2580.83 v1@1876.19,2625.28 ; J12.3@936.13,2388.67 J12.3@936.26,2388.8 ; v1(2252.83,2706.26) 2439.71,2706.26 2633.04,2512.94 2855.97,2512.94 2871.14,2528.1 2871.14,2621.11 2900.16,2650.13 3011.44,2650.13 3025.61,2664.31 U7.6@3025.61,2768.75
  Top Layer w15: v1@936.13,2348.61 J12.3@936.13,2388.67
  Bottom Layer w10: v1(1876.19,2628.28) 1925.18,2628.28 2002.9,2706 2252.57,2706 v1(2252.83,2706.26)
  Bottom Layer w15: R19.1@3025.61,2782.17 v1@3025.61,2811.83
OLED/ENC_SDA: J12.4 R18.1 U6.37 U7.5 | length 3003.5
  Top Layer w8: U7.5@3075.61,2768.75 v1(3075.61,2810.83) 3075.61,2844.4 3106.87,2875.66 U6.37@3140.38,2875.66
  Top Layer w10: J12.4@955.94,2477.39 955.94,2438.87 963.82,2431 1222.41,2431 1239.41,2414 1239.41,2354.12 1257.08,2336.45 1380.05,2336.45 1400.69,2357.09 1400.69,2521.69 1463.45,2584.45 1824.02,2584.45 v1(1845.31,2605.73) ; v1(2252.92,2676) 2445.93,2676 2625.99,2495.94 2863.01,2495.94 2888.14,2521.06 2888.14,2614.07 2907.2,2633.13 3060.97,2633.13 3075.61,2647.77 U7.5@3075.61,2768.75
  Top Layer w15: J12.4@955.94,2477.39 v1(955.94,2513.75)
  Bottom Layer w10: v1(1845.31,2605.73) 1847.08,2603.96 1943.18,2603.96 2015.21,2676 v1@2249.92,2676
  Bottom Layer w15: R18.1@3075.61,2782.17 v1@3075.61,2811.83
PR1: R6.1 R8.2 U2.4
RE/DE/RS485: R81.2 U6.22 | length 1387.5
  Top Layer w7: U6.22@3267.35,3034.13 3267.38,3093.99 v1(3268.35,3094.96)
  Ground w10: v1(2928,2017) 3064.65,2017 3156.86,2109.21 3156.86,2983.06 3268.35,3094.55 v1(3268.35,3094.96)
  Bottom Layer w10: v1(2928,2017) 2928.13,2017.13 2928.13,2044.04 R81.2@2928.27,2044.17
RE/DE/RS485/T: R69.1 R70.1 U31.2 U31.3 U33.2 | length 583.3
  Power + Signal w10: v1(2834.14,2572) 2834.14,2290.68 2844.82,2280 v1(2928.27,2280)
  Bottom Layer w15: R69.1@2832.14,2471.25 2833.14,2472.25 2833.14,2525.48 U31.3@2834.14,2526.48 v1(2834.14,2572) ; R70.1@2884.14,2471.25 U31.2@2884.14,2526.48
  Bottom Layer w20: v1(2928.27,2280) U33.2@2928.27,2326.59
RELAY_1: U20.1 U28.25 | length 2754.8
  Top Layer w10: v1@2362.33,1843.9 2364.04,1842.19 2772.81,1842.19 2806.34,1808.66 v1(2806.34,1741.91)
  Power + Signal w10: v1(702.14,2378.96) 722.1,2359 820,2359 873,2306 873,1930.08 930.52,1872.56 2274.67,1872.56 2303.33,1843.9 v1@2362.33,1843.9
  Bottom Layer w10: U28.25@2723.67,1724.59 2724.37,1725.3 2789.72,1725.3 v1(2806.34,1741.91)
  Bottom Layer w18: U20.1@702.14,2341.39 v1(702.14,2378.96)
  other v1: 2362.33,1842.9
RELAY_2: U20.2 U28.26 | length 2709.3
  Top Layer w10: v1(2362,1809) 2756.39,1809 2771,1794.39 v1(2771,1752)
  Power + Signal w10: v1(652.14,2378.96) 689.1,2342 812.96,2342 856,2298.96 856,1923.04 923.48,1855.56 2267.44,1855.56 2314,1809 v1(2362,1809)
  Bottom Layer w10: U28.26@2723.67,1750.18 2724.58,1751.09 2770.09,1751.09 v1(2771,1752)
  Bottom Layer w18: U20.2@652.14,2341.39 v1(652.14,2378.96)
RELAY_3: U20.3 U28.27 | length 2618
  Top Layer w10: v1@2362,1776.57 v1@2659.35,1776.57
  Power + Signal w10: v1(602.14,2378.96) 656.1,2325 805.92,2325 839,2291.92 839,1916 916.44,1838.56 2258.44,1838.56 2320,1777 v1@2351,1777
  Bottom Layer w10: v1@2659.35,1776.57 2659.75,1776.17 2723.27,1776.17 U28.27@2723.67,1775.77
  Bottom Layer w18: U20.3@602.14,2341.39 v1(602.14,2378.96)
  other v1: 2667.4,1776.57 2362,1777
RET_K1: K1.4 U20.16 | length 1125.1
  Top Layer w30: K1.4@415.47,3081.09 298.24,3081.09 242.4,3025.26 242.4,2636.73 307.56,2571.57 667.4,2571.57 v1(702.4,2606.57)
  Bottom Layer w15: U20.16@702.14,2567.76 U20.16@702.27,2567.89 ; v1@702.27,2606.44 v1(702.4,2606.57)
  Bottom Layer w18: U20.16@702.27,2567.89 v1@702.27,2606.44
RET_K2: K2.4 U20.15 | length 818
  Top Layer w30: v1(652.14,2531.57) 702.4,2531.57 867.4,2696.57 867.4,3026.2 922.29,3081.09 K2.4@1013.21,3081.09
  Bottom Layer w18: v1(652.14,2531.57) U20.15@652.14,2567.76
RET_K3: K3.4 U20.14 | length 1567.5
  Top Layer w30: v1(602.14,2531.57) 602.14,2497.49 618.05,2481.57 721.34,2481.57 811.34,2571.57 1397.09,2571.57 1452.4,2626.89 1452.4,3028.47 1505.02,3081.09 K3.4@1609.21,3081.09
  Bottom Layer w18: v1(602.14,2531.57) U20.14@602.14,2567.76
RS232_RX: F22.1 J13.2 | length 364.8
  Bottom Layer w20: F22.1@2653.09,3160.19 2643.62,3160.19 2633.93,3169.87 2633.93,3402.42 J13.2@2711.09,3479.58
RS232_TX: F19.1 J13.3 | length 365.7
  Bottom Layer w20: J13.3@2511.09,3479.58 2591.69,3398.98 2591.69,3169.87 2582,3160.19 F19.1@2573.09,3160.19
RS485_N: F20.2 J10.2 | length 282.9
  Bottom Layer w8: F20.2@3255.1,3290.19 3235.32,3290.19 3225.64,3299.87 3225.64,3301.01 3222.09,3304.56 3222.09,3444.09 3244.72,3466.72 3298.23,3466.72 J10.2@3311.09,3479.58
RS485_P: F21.2 J10.3 | length 281.8
  Bottom Layer w8: J10.3@3111.09,3479.58 3127.12,3463.55 3177.45,3463.55 3200.09,3440.91 3200.09,3305.39 3184.88,3290.19 F21.2@3165.1,3290.19
RST_A: R47.1 SB2.2 U11.18 | length 63.5
  Bottom Layer w10: 2663.21,548.09 2663.72,548.6 U11.18@2723.36,548.6 U11.18@2721.11,546.35
RST_B: R54.1 SB1.2 U27.18 | length 53.7
  Bottom Layer w10: SB1.2@2670.37,1041.23 SB1.2@2670.51,1041.09 2670.86,1041.45 2723.32,1041.45 U27.18@2723.68,1041.8
RST_C: R55.1 SB3.2 U28.18 | length 87.9
  Bottom Layer w10: R55.1@2668.67,1515.37 SB3.2@2668.67,1547.46 2669.67,1546.46 2722.67,1546.46 U28.18@2723.67,1545.46
RXD/RS485/RS232: R79.2 U6.23 | length 1586.3
  Top Layer w7: v1(3244.6,3121.38) 3246.04,3119.93 3246.04,3093.76 ccw(c3267.35,3093.65) 3246.04,3093.65 3246.04,3085.67 3251.23,3080.47 3251.23,3034.5 U6.23@3251.6,3034.13
  Ground w10: v1(2756.27,2020) 2785.75,2049.48 3073.08,2049.48 3139.86,2116.25 3139.86,2996.53 3244.33,3101 3244.33,3121.11 v1(3244.6,3121.38)
  Bottom Layer w10: v1(2756.27,2020) R79.2@2756.27,2044.17
RXD/RS485/RS232/T: R68.1 U30.9 U31.1 U32.7 | length 1291.9
  Ground w10: v1(2756,2280) 2777.46,2301.46 2777.46,2443.25 2806.46,2472.25 v1(2966.46,2472.25)
  Power + Signal w10: v1(2252.92,2589.33) 2252.92,2475.08 2298,2430 2441.72,2430 2626.72,2245 2721,2245 v1(2756,2280)
  Bottom Layer w10: U30.9@2310.71,2588.52 U30.9@2311.52,2587.72 ; U32.7@2756.13,2326.4 U32.7@2756.27,2326.26
  Bottom Layer w15: v1@2254.81,2588.52 U30.9@2310.71,2588.52 ; U31.1@2934.14,2526.48 R68.1@2934.14,2471.25 2934.64,2471.75 2965.96,2471.75 v1(2966.46,2472.25)
  Bottom Layer w20: v1@2756.13,2280 U32.7@2756.13,2326.4
RXD/SLOTB_UART_RX: J17.3 J20.11 U6.50 | length 3858.3
  Top Layer w7: U6.50@3283.1,2764.44 3283.93,2763.61 3283.93,2733.59 v1(3285.17,2732.34)
  Top Layer w10: J17.3@1747.09,2466.15 1747.09,2288.15 1869.82,2165.41 v1(1870.16,2165.41) ; v1@1869.99,2165.24 1946.9,2088.33 1946.9,1863.04 2013.12,1796.82 2013.12,1432.02 2021.47,1423.66 J20.11@2083.72,1423.66
  Power + Signal w10: v1(1870.16,2165.41) 2070.31,2165.41 2100.92,2196.02 2100.92,2311.76 2142.13,2352.97 2282.03,2352.97 2350,2285 2470,2285 2603,2152 v1(2604.81,2152)
  Bottom Layer w10: v1(2604.81,2152) 2604.81,2040.18 2680.79,1964.2 2960.23,1964.2 3017.85,1906.59 3234.35,1906.59 3285.17,1957.41 v1(3285.17,2732.34)
Shell_: C1.2 J3.S1 J3.S2 J3.S3 J3.S4 R4.1 | length 1467.2
  Top Layer w50: J3.S1@39.48,284.57 J3.S2@-125.09,284.57 J3.S3@-125.09,625.13 J3.S4@39.48,625.13
  Bottom Layer w10: C1.2@126.44,283.5 133.94,276 R4.1@133.94,238.5
  Bottom Layer w50: J3.S2@-125.09,284.57 J3.S3@-125.09,625.13 J3.S4@39.48,625.13 J3.S4@60,625.13 ; J3.S2@-116.62,283.21 107.14,283.21
SLOTA_CS: J21.37 U6.12 | length 2734
  Top Layer w7: U6.12@3410.07,2970.15 3439.95,2970.15 v1@3440.9,2969.21
  Top Layer w10: J21.37@2083.72,2291.23 J21.37@2083.84,2291.11 ; v1@2223.37,2291.11 v1(2223.49,2291)
  Top Layer w15: J21.37@2083.84,2291.11 v1@2223.37,2291.11
  Ground w8: v1(2223.49,2291) 2184.65,2329.84 2184.65,3227.64 2237.24,3280.24 3406.65,3280.24 3457.08,3229.81 3457.08,3091.18 3418.59,3052.69 3418.59,2976.57 3424.84,2970.32 3440.29,2970.32 v1(3441.4,2969.21)
SLOTA_MISO: J12.12 J21.41 U6.10 | length 4663.5
  Top Layer w5: U6.10@3410.07,2938.65 U6.10@3410.22,2938.5 ; v1@3440.74,2938.5 v1@3440.9,2938.35
  Top Layer w7: U6.10@3410.22,2938.5 v1@3440.74,2938.5
  Top Layer w10: J21.41@2083.72,2228.24 J21.41@2084.1,2228.61 ; v1@2193.63,2228.61 v1@2194,2228.98
  Top Layer w15: J12.12@1113.42,2477.39 v1(1113.42,2513.75) ; J21.41@2084.1,2228.61 v1@2193.63,2228.61
  Ground w8: v1(2199,2228.98) 2199,2291.45 2167.65,2322.8 2167.65,3234.69 2209.99,3277.04 2209.99,3277.58 2219.07,3287.06 2219.22,3287.22 2229.24,3297.24 3410.86,3297.24 3472.08,3236.02 3472.08,2967.63 3442.8,2938.35 v1@3440.9,2938.35
  Power + Signal w10: v1(1113.42,2513.75) 1113.42,2543.45 1127.97,2558 1353.82,2558 1374,2537.82 1374,2108.17 1507.17,1975 2080.49,1975 2199,2093.51 v1(2199,2228.98)
  other v1: 3441.4,2938.35
SLOTA_MOSI: J12.13 J21.43 U6.11 | length 4484
  Top Layer w7: v1@3378.97,2954.38 U6.11@3410.04,2954.38
  Top Layer w15: v1(1133.11,2348.74) J12.13@1133.11,2388.8 ; J21.43@2083.98,2197 v1(2248,2197)
  Ground w8: v1(2248,2197) 2248,2300.98 2201.65,2347.33 2201.65,3220.6 2244.28,3263.24 3402.44,3263.24 3442.08,3223.6 3442.08,3099.64 3403.59,3061.15 3403.59,2963.46 3395.28,2955.15 3379.32,2955.15 v1(3378.46,2954.29)
  Power + Signal w10: v1(1133.11,2348.74) 1174.01,2389.64 1280.72,2389.64 1340,2330.36 1340,2094.08 1493.08,1941 2101.89,1941 2248,2087.11 v1(2248,2197)
SLOTA_SCLK: J12.11 J21.39 U6.9 | length 4599.7
  Top Layer w8: v1(3378.46,2922.9) v1@3382.15,2922.91 ; v1@3381.1,2921.86 cw(c3382.15,2921.86) v1@3382.15,2922.91 ; U6.9@3410.07,2922.91 v1@3382.15,2922.91
  Top Layer w10: v1@1092,2348.74 v1@1092.87,2349.61 ; J12.11@1092.87,2387.93 J12.11@1093.74,2388.8
  Top Layer w15: v1@1092.87,2349.61 J12.11@1092.87,2387.93 ; J21.39@2083.72,2259.73 2084.11,2260.12 2223.1,2260.12 v1(2223.49,2260.51) 2270.86,2260.51 2281.71,2271.37 2281.71,2389.65 2269.9,2401.46 v1(2245.14,2401.46)
  Power + Signal w10: v1(1093.74,2348.74) 1151.64,2406.64 1287.76,2406.64 1357,2337.4 1357,2101.12 1500.12,1958 2092.84,1958 2223.49,2088.65 v1(2223.49,2260.51) ; v1(2245.14,2401.46) 2176,2470.61 2176,3200.58 2210.79,3235.37 3438.44,3235.37 3459.08,3214.73 3459.08,3098.99 3403.59,3043.5 3403.59,2942.91 3383.58,2922.9 v1@3381.3,2922.9